# Altium PCB A313_4.PcbDoc (part 2 of 3)
Units mm, origin at the board's own origin, x right, y up, seen from the top; angles counter-clockwise.
Board outline 230 x 157 mm, 2 copper layers (Top Layer, Bottom Layer); 244 components, 187 nets, 1242 pads, 1093 vias.
Unrouted connection lines stored in the file: 1.
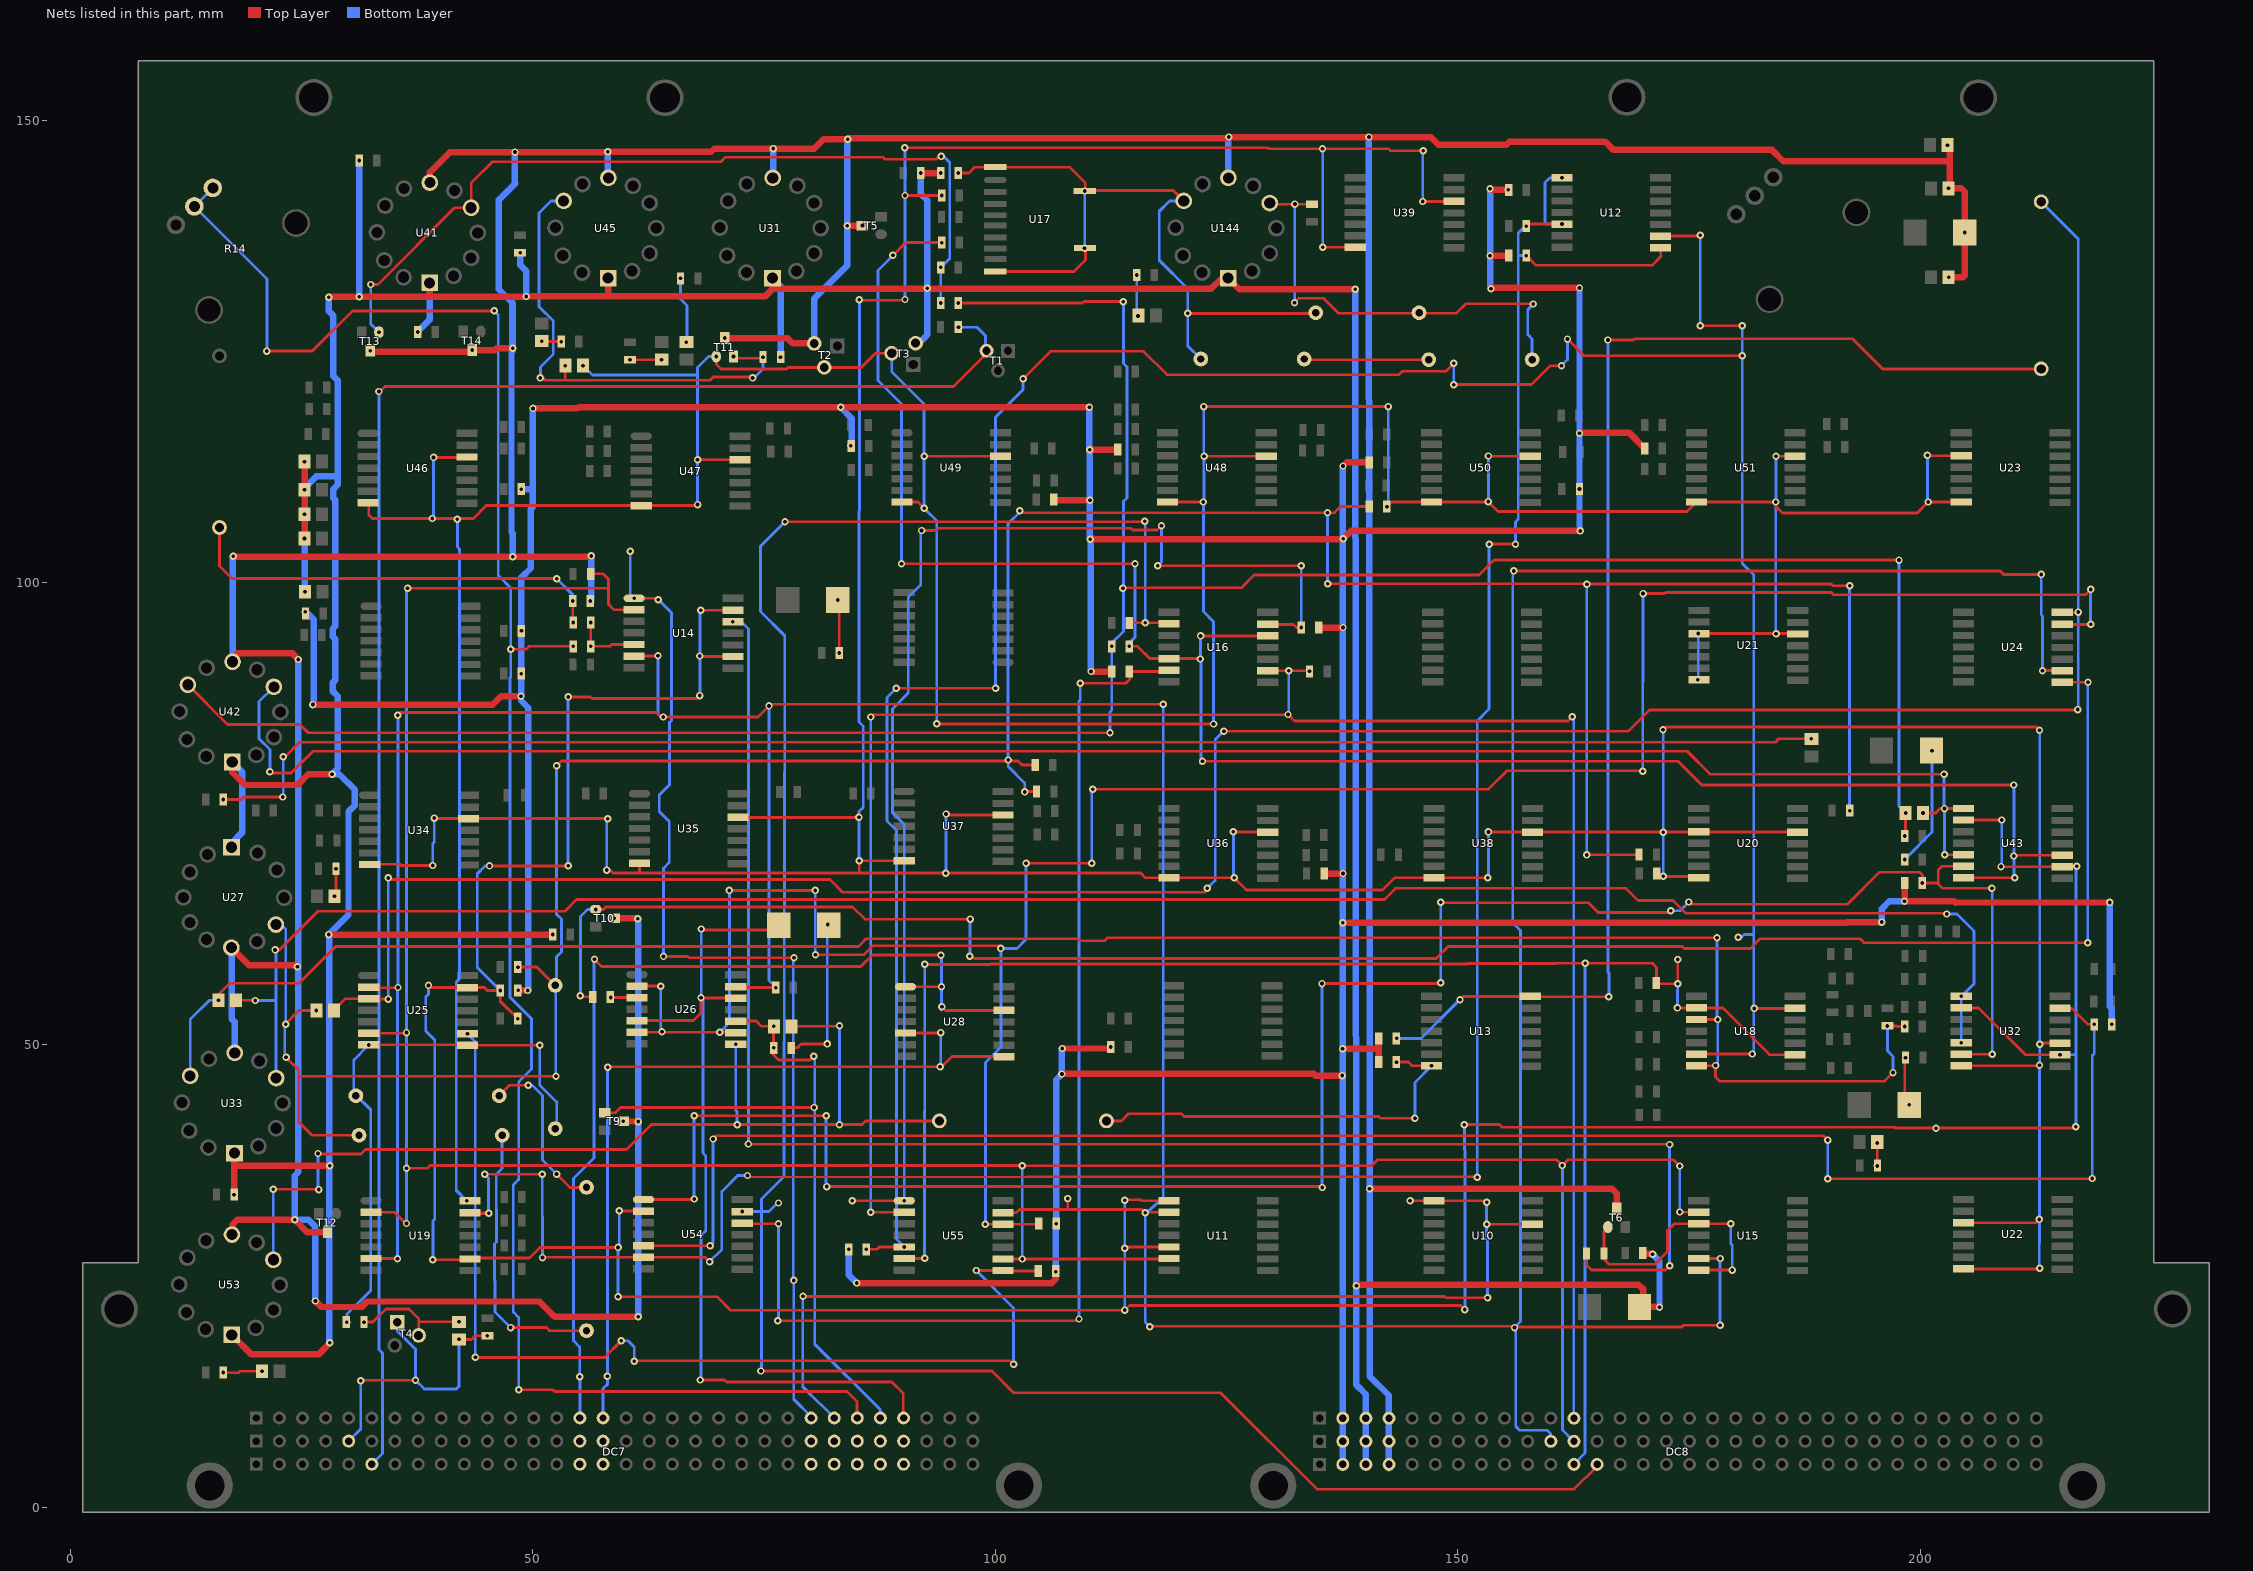
[diagram p2: the nets of this part, all layers, seen from the top]

## Via types
v1: diameter 0.8, hole 0.4, Top Layer to Bottom Layer, 1092 vias
v2: diameter 0.8, hole 0.4, Top Layer to Bottom Layer, tented top, 1 vias

## Nets (pads, with @x,y where several pads share a name; then routed paths per layer and width w, separated by ;. In a path a pad name is that pad's centre, name@x,y a point inside that pad or via, vN(x,y) a via of type N, cw(c..) or ccw(c..) an arc to the next point about the centre after c; other vN are vias at no path point) (continued)
+12,6V: C9.1 C14.1 C16.1 C18.1 DC8.A4 DC8.B4 DC8.C4 R12.2 T2.2 T5.2 T6.2 T9.2 T10.2 T11.2 T12.2 T13.2 T14.2 U27.7 U31.7 U33.7 U41.7 U42.7 U45.7 U53.7 U144.7 | length 720.9
  Top Layer w0.7: U27.7@17.375,60.519 U27.7@17.4,60.494 ; U27.7@17.4,61.019 U27.7@17.4,60.494 ; U53.7@17.508,29.455 17.508,30.558 18.025,31.075 v1(24.225,31.075) 25.563,29.737 T12.2@27.776,29.737 ; U42.7@17.508,91.431 17.508,91.783 18.05,92.325 24,92.325 24.625,91.7 v1(24.625,91.675) ; v1(17.575,102.85) 17.6,102.875 17.7,102.775 v1(47.8,102.775) 56.2,102.775 v1(56.3,102.875) ; v1(24.525,58.45) 24.35,58.625 19.269,58.625 U27.7@17.4,60.494 ; v1(26.475,22.3) 27.125,21.65 31.461,21.65 32.055,22.244 50.69,22.244 52.334,20.6 v1(61.375,20.6) ; T13.2@32.275,124.95 43.232,124.95 v1(43.417,125.135) 45.875,125.135 46.065,125.325 v1(47.8,125.325) ; U41.7@38.844,143.247 38.844,144.344 41.05,146.55 v1(48.05,146.55) 58.051,146.55 v1(58.076,146.575) 69.275,146.575 69.6,146.9 75.95,146.9 v1(75.975,146.925) 80.425,146.925 81.45,147.95 v1(84.025,147.95) 84.143,148.068 125.143,148.068 v1(125.25,148.175) v1(140.4,148.175) 147.1,148.175 147.925,147.35 155.269,147.35 155.569,147.65 165.975,147.65 166.85,146.775 184,146.775 185.21,145.565 203.218,145.565 ; v1(58.788,63.701) 61.069,63.701 v1@61.11,63.66 ; v1(59.776,41.724) v1(61.375,41.7) ; v1(70.749,126.438) 77.5,126.438 78.085,125.853 T2.2@80.416,125.853 ; T2.2@80.287,125.723 T2.2@80.407,125.603 ; v1(83.998,138.573) T5.2@85.299,138.573 ; v1(140.475,34.425) 166.7,34.425 167.19,33.935 T6.2@167.19,32.302 ; v1(203.091,133.011) 204.661,133.011 204.838,133.188 v1(204.838,137.853) 204.838,142.262 204.45,142.65 C16.1@203.25,142.65 ; C18.1@203.218,147.475 203.218,145.565 ; C16.1@203.599,142.663 203.218,143.044 203.218,145.565
  Bottom Layer w0.7: U27.7@17.4,60.519 17.4,52.825 17.75,52.475 U33.7@17.75,49.131 ; U42.7@17.508,91.431 v1@17.508,102.7 ; v1(24.625,91.675) 24.625,36.25 24.225,35.85 v1(24.225,31.075) 25.725,31.075 26.475,30.325 v1(26.475,22.3) ; v1@47.75,125.025 47.75,130.275 ; v1(47.8,102.775) 47.8,105.301 47.676,105.425 47.676,125.201 v1(47.8,125.325) 47.8,130.225 47.75,130.275 ; v1(48.05,146.55) 48.05,143.175 48.075,143.15 46.3,141.375 46.3,131.725 47.75,130.275 ; v1@56.3,97.993 v1(56.3,102.875) ; v1(58.076,146.575) 58.076,144.027 58.225,143.878 58.125,143.778 U45.7@58.148,143.755 ; v1(61.325,63.625) 61.375,63.575 v1(61.375,41.7) v1(61.375,20.6) ; U31.7@75.928,143.755 75.875,143.808 75.975,143.908 v1(75.975,146.925) ; T2.2@80.407,125.603 80.407,130.707 83.975,134.275 83.975,147.9 v1(84.025,147.95) ; U144.7@125.204,143.755 125.204,147.996 v1(125.25,148.175) ; v1(140.4,148.175) v1(140.475,34.425) 140.475,14.175 142.55,12.1 DC8.A4@142.55,4.225
  other v1: 56.201,97.993 32.401,125.062 85.637,138.599 203.075,142.625 202.975,147.3
-12,6V: C10.2 C11.2 C12.2 C13.2 C15.2 C17.2 DC8.A3 DC8.B3 DC8.C3 R25.1 R47.2 R48.2 R71.2 R72.2 R77.2 R78.2 R98.2 R99.2 T3.3 U27.1 U31.1 U33.1 U41.1 U42.1 U45.1 U53.1 U144.1 | length 552.6
  Top Layer w0.7: U53.1@17.483,18.609 19.567,16.525 26.8,16.525 28.025,17.75 v1(28.025,17.775) ; U42.1@17.483,80.585 17.483,79.492 18.875,78.1 24.525,78.1 25.7,79.275 v1(28.275,79.275) ; v1(17.676,33.793) 17.676,38.237 U33.1@17.725,38.285 17.725,37.175 17.975,36.925 v1(28.025,36.925) ; v1(25.296,113.072) C12.2@25.296,110.024 v1(25.3,110.02) v1(25.3,107.375) v1(25.3,104.75) ; v1@27.875,61.95 v1(27.9,61.925) v1(52.132,61.925) ; v1(27.925,130.85) 27.975,130.9 v1(31.225,130.9) 38.775,130.9 ; U41.1@38.7,132.283 U41.1@38.819,132.401 38.819,130.944 38.775,130.9 ; U45.1@58.123,132.909 58.123,130.998 58.1,130.975 ; U31.1@75.903,132.909 75.903,131.741 ; v1(91.927,144.28) R25.1@94.091,144.28 ; v1(138.925,131.7) 126.388,131.7 U144.1@125.179,132.909 124.471,132.909 123.325,131.763 75.925,131.763 75.903,131.741 ; v1(139.05,23.95) 139.159,24.059 169.591,24.059 170.046,23.604 C10.2@170.046,22.625 ; C10.2@169.645,21.661 171.789,21.661 v1(171.825,21.625) ; R47.2@170.026,27.418 171.007,27.418 v1(171.075,27.35) ; 38.775,130.9 49.2,130.9 49.275,130.975 58.1,130.975 ; 58.1,130.975 75.137,130.975 75.903,131.741
  Bottom Layer w0.7: U27.1@17.425,71.865 18.575,73.014 18.575,79.493 U42.1@17.483,80.585 ; v1(25.3,104.75) 25.325,104.725 v1@25.325,99.35 ; v1(25.3,110.02) 25.3,110.2 26.575,111.475 28.9,111.475 ; v1(27.9,61.925) 30.05,64.075 30.05,75.225 30.75,75.925 30.75,77.575 29.05,79.275 v1(28.275,79.275) 28.9,79.9 28.9,87.69 28.325,88.265 28.325,89.135 28.6,89.41 28.6,93.89 28.35,94.14 28.35,95.01 28.6,95.26 28.6,108.94 28.375,109.165 28.375,110.035 28.9,110.56 28.9,111.475 ; v1(27.925,130.85) 27.925,129.35 28.4,128.875 28.4,122.344 28.9,121.844 28.9,111.475 ; v1@27.984,61.925 27.984,17.709 28.025,17.75 v1(28.025,17.775) ; v1(31.199,145.632) 31.199,130.926 v1(31.225,130.9) ; v1(37.549,127.082) 37.549,127.149 38.819,128.419 U41.1@38.819,132.401 ; v1(48.618,135.674) 48.618,134.332 49.275,133.675 v1(49.275,130.925) ; U31.1@75.903,132.909 76.776,132.036 v1(76.776,124.368) ; T3.3@91.432,125.578 92.625,126.771 v1(92.625,131.825) 92.625,141.325 91.927,142.023 v1(91.927,144.28) ; v1(138.925,131.7) v1(139.05,23.95) 139.05,13.225 140.05,12.225 DC8.A3@140.05,4.625 ; v1(171.075,27.35) 171.825,26.6 v1(171.825,21.625)
  other v1: 25.35,99 94.101,144.275
-20V: DC8.A2 DC8.B2 DC8.C2 R11.2 R15.2 R44.1 R45.2 R101.2 R102.2 R103.2 R104.2 R109.2 R110.2 R111.2 R112.2 R117.2 R118.2 R119.2 R120.2 R125.2 R126.2 R127.2 R128.2 R133.2 R134.2 R135.2 R136.2 | length 621.2
  Top Layer w0.7: v1(26.2,86.8) 45.65,86.8 46.55,87.7 v1(48.7,87.7) ; R11.2@48.366,55.888 v1@49.437,55.888 ; v1(50,118.825) 54.801,118.825 54.925,118.949 106.85,118.949 106.851,118.95 v1(110.175,118.95) ; R110.2@84.136,27.889 v1(84.147,27.9) ; v1@85,24.228 106.078,24.228 106.532,24.682 R111.2@106.532,25.185 ; R128.2@106.326,108.893 v1(110.232,108.893) ; v1(107.2,46.85) 134.45,46.85 134.625,46.675 v1(137.525,46.675) ; v1(107.231,49.606) 112.323,49.606 v1(112.474,49.757) ; v1(110.225,114.35) 113.192,114.35 R125.2@113.224,114.382 ; v1(110.275,104.675) 137.575,104.675 v1(137.625,104.725) 138.475,105.575 v1(163.25,105.575) ; v1(110.352,90.373) R104.2@112.584,90.373 ; R109.2@134.98,95.131 v1(137.594,95.131) ; R126.2@135.551,68.543 135.914,68.543 135.569,68.525 v1(137.6,68.525) ; v1(137.55,49.575) 141.309,49.575 141.462,49.728 R44.1@141.462,50.808 ; v1(137.575,63.2) 192.05,63.2 192.125,63.275 v1(195.85,63.275) ; 137.979,112.979 R133.2@140.446,112.979 ; R45.2@141.462,48.258 141.462,49.575 ; v1@153.6,131.85 v1@163.15,131.85 ; v1@153.607,142.486 v1(155.485,142.486) ; v1@153.694,135.331 R15.2@155.51,135.331 ; v1@163.175,116.175 168.57,116.175 R135.2@170.242,114.503 ; R101.2@198.353,67.513 198.353,65.553 v1(198.325,65.525) 203.674,65.525 203.818,65.381 v1(220.525,65.4)
  Bottom Layer w0.7: v1@25.412,96.869 26.29,95.99 26.29,94.764 26.301,94.753 26.301,93.883 26.29,93.872 26.29,86.89 v1(26.2,86.8) ; 48.726,87.199 49.475,86.45 v1@49.475,55.9 ; v1@48.726,87.7 v1(48.726,90.143) 48.726,94.743 v1(48.751,94.768) 48.751,100.551 49.75,101.55 49.75,107.95 50,108.2 v1(50,118.825) ; v1(48.726,110.074) 48.727,110.075 49.75,110.075 ; v1(83.275,118.95) 84.451,117.774 84.451,114.937 84.361,114.937 84.424,114.874 84.354,114.804 v1(84.354,114.781) ; v1(84.147,27.9) 84.147,25.103 v1(85,24.25) ; v1(106.525,25.475) 106.525,30.775 v1@106.576,30.724 ; v1(106.576,30.668) v1@106.576,30.724 ; v1@107.2,49.475 v1(107.2,46.85) 106.575,46.225 106.576,46.224 v1@106.576,30.724 ; v1(110.175,118.95) 110.175,114.514 110.225,114.464 v1(110.225,114.35) 110.225,105.025 v1@110.307,104.943 ; v1@110.3,90.55 v1@110.3,104.9 ; DC8.A2@137.55,4.625 v1(137.55,49.575) v1@137.55,112.55 ; v1@153.525,131.775 v1@153.525,142.575 ; v1@163.174,105.651 v1(163.174,110.117) v1(163.175,131.85) ; v1(195.85,63.275) 195.85,64.7 196.675,65.525 v1(198.325,65.525) ; v1(220.525,65.4) 220.525,54.15 220.749,53.926 v1(220.749,52.218)
  other v1: 49.45,55.875 48.401,55.893 25.374,96.832 137.6,112.6 163.175,116.15 153.6,131.775 153.5,135.35 153.5,142.575
"A PR": DC7.A15 DC7.B15 DC7.C15 U28.1 U28.12 | length 106
  Top Layer w0.3: v1(56.65,59.25) 57.425,58.475 85.45,58.475 86.7,59.725 93.7,59.725 93.9,59.925 v1(94.125,59.7) ; U28.1@90.275,56.276 v1(94.174,56.276) v1@94.175,56.275 ; v1(94.225,54.125) 94.624,53.726 U28.12@100.95,53.726
  Bottom Layer w0.3: DC7.C15@55.075,9.65 55.075,14.075 v1(55.05,14.1) 55.05,17.332 54.375,18.007 54.375,35.525 56.6,37.75 v1@56.6,59.225 ; v1(94.125,59.7) 94.132,59.7 94.174,59.659 v1(94.174,56.276) v1@94.174,53.779
AA: R21.2 R26.1 T13.1 U41.5 | length 91.1
  Top Layer w0.3: v1(32.45,132.225) 33.225,132.225 41.529,140.529 U41.5@43.314,140.529 43.314,143.189 45.632,145.507 70.333,145.507 70.826,146 87.874,146 88.099,145.775 93.6,145.775 v1@93.825,146
  Bottom Layer w0.3: v1(32.45,132.225) 32.45,127.96 v1(33.341,127.069) ; v1@94.15,130.267 94.099,130.318 v1(94.099,134.082) 95.075,135.058 95.075,145.425 94.425,146.075 v1(94.15,146.075)
  other v1: 94.101,130.218
B: R22.2 R249.2 U16.5 U16.12 U43.7 U43.10 | length 214.5
  Top Layer w0.3: v1(88.925,135.375) 90.307,136.757 v1(94.199,136.757) ; v1@89.825,101.875 v1(89.85,102.025) v1(115.1,102.025) ; v1(114.484,93.099) 115.376,93.099 116.705,91.77 U16.5@118.793,91.77 121.895,91.77 v1@121.9,91.775 ; v1@122.175,80.45 v1(122.4,80.675) 173.825,80.675 176.4,78.1 v1(210.15,78.1) ; v1(122.195,94.22) U16.12@129.467,94.22 ; U43.7@204.708,68.061 v1(210.236,68.061) v1@210.15,68.148 ; v1(210.15,70.425) 210.236,70.511 U43.10@215.383,70.511
  Bottom Layer w0.3: v1(88.925,135.375) 87.3,133.75 87.3,121.85 89.85,119.3 v1@89.85,101.85 ; v1(114.484,93.099) 114.484,93.459 115.1,94.075 v1@115.1,101.775 ; v1@122.175,80.45 122.235,80.51 122.235,91.665 v1(122.175,91.725) ; v1@122.195,91.745 v1(122.195,94.22) ; v1@210.15,68.148 v1(210.15,70.425) v1(210.15,78.1)
"B PR": DC7.A16 DC7.B16 DC7.C16 U28.5 U28.8 | length 89.5
  Top Layer w0.3: v1@58.05,47.6 58.045,47.583 58,47.425 58.2,47.625 v1(94.025,47.625) 94.2,47.625 95.301,48.726 U28.8@100.95,48.726 ; U28.5@90.275,51.276 94.051,51.276 v1(94.1,51.325)
  Bottom Layer w0.3: DC7.C16@57.55,9.65 DC7.C16@57.575,9.675 ; DC7.C16@57.575,9.65 DC7.C16@57.575,9.675 ; v1(58.075,47.575) 58.05,47.55 v1(58.05,14.175) 58.05,13.3 57.575,12.825 DC7.C16@57.575,9.675 ; v1(94.025,47.625) 94.075,47.625 94.1,47.6 v1(94.1,51.325)
"COMP[NX UOP": DC7.A27 DC7.B27 DC7.C27 R14.1 R14.2 R16.1 | length 213.5
  Top Layer w0.3: v1(21.225,125.025) 26.125,125.025 30.475,129.375 v1(45.8,129.375) ; v1(47.6,92.775) 49.226,92.775 49.55,93.099 v1(54.34,93.099) ; v1(48.45,12.7) 52.134,12.7 52.334,12.5 83.975,12.5 85.05,11.425 DC7.C27@85.05,9.65
  Bottom Layer w0.3: R14.1@15.375,142.675 R14.2@13.375,140.675 21.225,132.825 v1(21.225,125.025) ; v1@45.65,129.5 46.25,128.9 46.25,100.75 47.6,99.4 v1(47.6,92.775) 47.6,89.791 47.525,89.716 47.525,55.15 49.85,52.825 49.85,47.4 48.45,46 48.45,35.45 47.875,34.875 47.875,21.1 48.45,20.525 v1(48.45,12.7)
"COMPAR CONTR": DC7.A6 R31.1 T1.3 | length 189.5
  Top Layer w0.3: v1(33.341,120.65) 33.427,120.65 33.976,121.199 95.464,121.199 T1.3@98.937,124.673 ; R31.1@95.991,127.871 96.025,127.837 v1(96.025,127.6)
  Bottom Layer w0.3: DC7.A6@32.55,4.65 33.725,5.825 33.725,16.65 33.341,17.034 v1(33.341,120.65) ; v1(96.025,127.6) 98.021,127.6 98.937,126.684 T1.3@98.937,124.673
"compar rpr": C23.2 DC7.B5 R46.1 T4.1 | length 33.8
  Top Layer w0.3: v1(31.375,13.675) 31.425,13.725 v1(37.3,13.725) ; v1(42,18.15) 43.35,18.15 43.751,18.551 v1(45.057,18.551)
  Bottom Layer w0.3: DC7.B5@30.05,7.15 31.375,8.475 v1(31.375,13.675) ; T4.1@35.325,20 35.325,19.05 37.3,17.075 v1@37.3,13.825 ; v1@37.1,13.8 37.275,13.8 v1@37.3,13.825 ; v1(42,18.15) 42,13.075 41.7,12.775 38.25,12.775 v1(37.3,13.725) v1@37.3,13.825
"CONTACT R": C21.1 DC7.A28 DC7.B28 DC7.C28 R283.2 T9.1 U26.10 | length 77
  Top Layer w0.3: T9.1@57.769,42.664 58.936,42.664 59.497,43.225 v1(80.4,43.225) v1@80.2,43.425 ; U26.10@71.936,52.573 74.15,52.573 74.722,52 C21.1@76.024,52 ; v1(76.05,52) C21.1@76.024,52 ; v1(80.375,48.775) 79.975,48.375 76.55,48.375 76.024,48.901 v1(76.024,49.682) C21.1@76.024,52
  Bottom Layer w0.3: 80.425,48.35 80.475,48.3 80.475,17.625 87.55,10.55 DC7.C28@87.55,9.65
"CONTACT X": C7.2 DC7.A29 DC7.B29 DC7.C29 U26.5 U26.12 | length 95.2
  Top Layer w0.3: U26.5@61.262,52.622 67.347,52.622 68.175,53.45 v1(68.175,55.1) 68.202,55.073 U26.12@71.936,55.073 ; v1(68.1,13.75) 70.725,13.75 70.95,13.525 88.8,13.525 90.05,12.275 DC7.C29@90.05,9.65 ; v1(68.2,62.525) 68.31,62.415 C7.2@76.502,62.415
  Bottom Layer w0.3: v1@68.175,13.95 68.175,29.35 68.675,29.85 68.675,38 68.375,38.3 68.375,54.9 v1(68.175,55.1) 68.2,55.125 v1(68.2,62.525)
D: DC8.B11 pad.2@107.825,33.375 R116.2 U11.2 U14.6 U15.6 U19.6 U24.9 U25.2 U26.13 U55.13 | length 518.6
  Top Layer w0.3: U25.2@32.242,56.245 32.313,56.175 v1(35.4,56.2) ; U19.6@32.496,26.893 35.332,26.893 v1(35.35,26.875) ; 35.65,85.95 63.375,85.95 v1@63.975,85.35 ; U14.6@60.944,92.044 v1@63.525,92.044 ; v1@64.275,85.45 74.325,85.45 v1(75.525,86.65) ; U26.13@71.936,56.323 72.049,56.21 R116.2@76.262,56.21 76.254,56.202 v1(76.254,56.178) ; v1@75.7,86.825 v1(118.15,86.825) ; U55.13@100.729,31.943 U55.13@100.829,31.943 ; U55.13@100.829,31.843 102.25,31.843 102.607,32.2 107.825,32.2 ; pad.2@107.825,33.375 107.825,32.2 ; v1@116.7,19.575 v1@156.15,19.575 ; U11.2@118.793,31.893 116.257,31.893 v1(116.207,31.843) 115.85,32.2 107.825,32.2 ; v1(156.075,101.25) 208.675,101.25 209.05,100.875 v1(213.1,100.875) ; v1@156.525,19.475 174.225,19.475 174.425,19.675 v1(178.375,19.675) ; U15.6@176.07,26.893 v1(178.382,26.893) ; v1@213.27,90.47 U24.9@215.383,90.47
  Bottom Layer w0.3: v1(35.35,26.875) v1@35.35,56.15 ; v1(35.4,56.2) v1@35.4,85.65 ; v1(63.525,92.075) 63.525,85.8 v1@63.875,85.45 ; v1(75.525,86.65) 75.525,56.949 76.275,56.199 v1(76.254,56.178) ; v1(116.207,31.843) 116.207,20.018 v1@116.574,19.651 ; v1@116.475,31.943 118.15,33.418 v1(118.15,86.825) ; v1@116.575,19.525 v1@116.574,19.651 ; v1(116.7,19.525) v1@116.574,19.651 ; v1@156.2,101.1 155.95,100.85 155.95,63.2 156.8,62.35 156.8,20.075 156.275,19.55 156.275,8.75 156.7,8.325 159.675,8.325 160.05,7.95 DC8.B11@160.05,7.125 ; v1@178.382,19.675 v1(178.382,26.893) ; v1(213.1,100.875) 213.1,96.525 213.25,96.375 v1(213.25,90.45)
  other v1: 156.15,19.425 64.075,85.45 35.375,85.65
D+C: R101.1 U32.6 U43.6 U54.1 | length 222
  Top Layer w0.3: U54.1@61.96,33.27 v1@67.425,33.27 ; v1(67.425,42.325) v1(81.7,42.325) ; v1(81.775,34.675) 135.25,34.675 v1(135.35,34.575) ; v1(135.325,56.625) v1@148.1,56.625 ; v1@148.3,65.375 164.125,65.375 165.2,64.3 v1@172.95,64.3 ; v1(175,65.45) 175.25,65.2 192.15,65.2 195.625,68.675 199.925,68.675 200.253,68.347 v1(200.253,67.513) 201.862,67.513 201.975,67.4 ; U32.6@204.454,48.991 v1(207.8,48.991) ; U43.6@204.708,69.311 202.386,69.311 201.975,68.9 201.975,67.4 ; v1(207.775,66.925) 202.45,66.925 201.975,67.4
  Bottom Layer w0.3: v1(67.425,33.325) v1(67.425,42.325) ; 81.7,35.125 v1(81.7,42.325) ; v1(135.325,56.625) 135.325,34.6 v1(135.35,34.575) ; v1@135.424,34.575 v1@135.425,34.375 ; v1(148.175,56.7) v1(148.175,65.425) ; v1(173.05,64.5) 174.05,64.5 v1(175,65.45) ; v1(207.8,48.991) v1@207.8,66.95
D+C_: R11.1 R105.2 U11.1 U11.5 U14.9 U14.13 U19.9 U25.13 U32.2 U32.9 U43.2 U43.9 U54.2 | length 407
  Top Layer w0.3: v1(38.7,56.425) 38.929,56.196 U25.13@42.917,56.196 44.75,56.196 45.057,55.888 v1(46.466,55.888) 46.466,54.719 v1(48.351,52.834) ; v1(39.175,26.75) 43.078,26.75 U19.9@43.171,26.843 U19.9@43.21,26.882 ; U19.9@43.278,26.95 49.625,26.95 50.742,28.092 v1(59.2,28.092) ; v1(45.3,69.35) v1@53.8,69.35 ; v1(53.8,87.625) 56.2,87.625 56.375,87.45 67.75,87.45 v1@68.05,87.75 ; v1(59.2,22.769) 69.906,22.769 71.375,21.3 v1@114,21.3 ; v1@59.325,32.02 U54.2@61.96,32.02 ; v1@68.131,96.994 U14.13@71.619,96.994 ; v1@68.194,91.994 U14.9@71.619,91.994 ; v1(114,21.319) 114.506,21.825 150.325,21.825 v1(150.778,21.372) ; v1@114.001,33.243 115.725,33.243 115.825,33.143 U11.1@118.793,33.143 ; v1@114.149,28.143 U11.5@118.793,28.143 ; v1(150.725,41.375) 154.5,41.375 154.775,41.1 197.175,41.1 197.281,40.994 v1@201.617,40.994 ; v1@201.725,40.886 v1@201.617,40.994 ; U32.2@204.454,53.991 206.334,53.991 211.384,48.941 v1(215.129,48.941) ; U43.2@204.708,74.311 v1(208.85,74.311) ; v1@208.761,69.261 U43.9@215.383,69.261 v1@216.892,69.261 ; v1@216.825,40.994 v1(201.725,40.994) v1@201.617,40.994
  Bottom Layer w0.3: v1(38.7,56.425) 38.7,55.475 38.4,55.175 38.4,51.5 39.375,50.525 39.375,31.15 39.175,30.95 v1(39.175,26.75) ; v1(45.3,69.35) 44.825,69.35 43.975,68.5 43.975,58.379 v1(46.466,55.888) ; v1(53.8,69.369) v1(53.8,87.625) ; v1(59.2,22.769) v1(59.2,28.092) ; v1@59.325,28.217 v1(59.325,32.05) ; v1(68.05,87.769) v1(68.05,92.05) v1@68.05,96.933 ; v1(114,21.319) v1(114,27.994) v1@114,33.175 ; v1(150.725,41.375) 150.725,38.678 150.778,38.625 v1(150.778,21.372) ; v1@208.85,69.369 v1(208.85,74.311) ; v1(215.129,48.941) 216.84,48.941 216.859,48.96 ; v1@216.859,41.184 216.859,48.96 ; v1@216.859,69.084 216.859,48.96
  other v1: 114,33.194 216.825,41.15 208.761,69.28 216.95,69.319 68.131,97.013
D_: R112.1 U24.13 U26.2 U26.6 U26.9 U55.12 | length 268.5
  Top Layer w0.3: U26.6@61.262,51.373 U26.9@71.886,51.373 ; U26.2@61.384,56.25 61.262,56.372 63.803,56.372 v1(63.825,56.35) ; v1(71.225,66.7) v1(80.525,66.7) ; v1(80.55,59.75) 85.8,59.75 86.775,60.725 100.3,60.725 v1(100.6,60.425) ; v1(98.925,30.593) U55.12@100.829,30.593 R112.1@104.476,30.593 ; v1(103.325,69.65) v1(110.425,69.65) ; v1(110.55,77.65) 153.325,77.65 155.31,79.635 v1@169.99,79.635 ; v1(170.05,98.8) v1@170.25,98.8 ; v1@170.125,98.675 v1@170.25,98.8 ; U24.13@215.383,95.47 v1(218.45,95.47) ; v1(218.45,99.25) 217.875,98.675 190.65,98.675 190.4,98.925 172.5,98.925 172.375,98.8 v1@170.25,98.8
  Top Layer w0.7: U26.9@71.886,51.373 U26.9@71.936,51.323
  Bottom Layer w0.3: v1@63.825,51.55 v1(63.825,56.35) ; v1(70.2,51.35) 71.25,52.4 v1@71.25,66.7 ; v1@80.525,60.025 v1(80.525,66.7) ; v1(98.925,30.593) 98.925,48.075 100.6,49.75 v1(100.6,60.425) 102.325,60.425 103.325,61.425 v1(103.325,69.65) ; v1(110.425,69.65) v1@110.425,77.775 ; v1(170.025,79.575) v1(170.05,98.8) ; v1(218.45,95.47) v1(218.45,99.25)
  other v1: 63.95,51.425
F: DC8.A12 pad.2@173.8,59.225 R114.2 U18.2 U18.9 U55.6 | length 192.4
  Top Layer w0.3: U55.6@90.154,26.893 92.343,26.893 v1(92.375,26.925) ; v1(92.375,58.7) 92.45,58.625 92.51,58.685 99.385,58.685 99.45,58.75 151.102,58.75 151.152,58.8 160.577,58.8 160.602,58.825 v1(163.8,58.825) 171.05,58.825 171.507,58.368 171.507,56.943 R114.2@171.629,56.821 ; R114.2@171.476,56.668 171.544,56.6 v1(173.8,56.6) pad.2@173.8,59.225 ; v1(173.764,53.991) U18.2@175.816,53.991 178.684,53.991 183.734,48.941 U18.9@186.49,48.941
  Bottom Layer w0.3: v1(92.375,26.925) 92.343,26.957 92.343,42.837 92.375,42.869 v1(92.375,58.7) ; DC8.A12@162.55,4.625 163.775,5.85 163.775,58.9 v1@163.725,58.95 ; v1(173.764,53.991) 173.764,55.859 173.8,55.823 v1(173.8,56.6)
F_: R110.1 U12.9 U18.6 U18.13 U55.5 | length 308
  Top Layer w0.3: v1(86.036,27.889) 87.196,27.889 87.45,28.143 v1(90.154,28.143) ; v1(89.3,88.575) v1(100.025,88.575) ; v1(103,122.025) 105.975,125 116.025,125 118.55,122.475 143.675,122.475 144.05,122.85 148.725,122.85 v1(149.575,123.7) ; v1(149.575,121.4) 157.975,121.4 160.025,123.45 v1(161.225,123.45) ; v1(161.875,126.325) 163.675,124.525 v1(180.775,124.525) ; U12.9@171.949,137.46 v1@176.035,137.46 ; U18.6@175.816,48.991 175.816,49.009 v1(181.841,49.009) ; v1(176.225,127.775) v1(180.775,127.775) ; v1(182.059,53.941) U18.13@186.49,53.941
  Bottom Layer w0.3: v1(89.3,88.575) 88.275,87.55 88.275,74.2 89.3,73.175 89.3,28.997 v1(90.154,28.143) ; v1(100.025,88.575) 100.025,117.875 103,120.85 v1@103,121.975 ; v1(149.575,121.4) v1(149.575,123.7) ; v1@161.4,123.625 161.875,124.1 v1(161.875,126.325) ; v1(176.225,127.775) v1(176.225,137.55) ; v1(180.35,61.625) 180.675,61.625 180.975,61.925 182.025,61.925 ; v1(180.775,127.775) v1(180.775,124.525) 180.775,102.05 182.025,100.8 182.025,61.925 ; v1@182.025,48.9 182.025,61.925
G: R24.2 R290.2 U20.3 U20.7 U20.12 U22.3 U22.7 U32.7 U32.10 U34.7 U34.12 U35.7 U35.12 U36.7 U36.12 U37.7 U37.12 U38.7 U38.12 U39.7 U39.12 | length 526.7
  Top Layer w0.3: U34.7@32.496,69.522 35.625,69.522 35.747,69.4 v1(39.169,69.4) ; v1@39.1,74.5 39.128,74.472 58.076,74.472 58.078,74.472 v1@58.1,74.45 ; v1@58.2,69.025 58.65,68.575 61.475,68.575 ; U35.7@61.392,69.525 U35.7@61.516,69.649 61.516,68.616 61.475,68.575 ; U35.12@72.19,74.599 v1(85.249,74.599) ; v1@85.301,130.518 90.276,130.518 v1@90.201,130.418 ; U37.7@90.154,69.903 v1(85.275,69.903) 85.275,68.575 ; v1(90.209,147.018) 90.216,147.025 94.544,147.025 94.55,147.018 129.467,147.018 129.567,146.918 v1(135.376,146.918) 142.522,146.918 142.74,146.7 v1(146.275,146.7) ; v1@90.257,141.857 v1(94.199,141.857) ; v1@94.7,74.975 94.822,74.853 U37.12@100.829,74.853 ; v1@125.75,73.05 125.789,73.011 U36.12@129.467,73.011 ; v1(125.84,68.054) 127.144,66.75 141.875,66.75 143.186,68.061 U38.7@147.431,68.061 v1(153.239,68.061) ; v1@125.9,68.025 125.864,68.061 U36.7@118.793,68.061 116.239,68.061 115.725,68.575 85.275,68.575 ; v1@135.4,136.3 135.44,136.26 U39.7@138.922,136.26 ; v1@146.235,141.21 U39.12@149.597,141.21 ; v1@153.55,73.1 153.639,73.011 U38.12@158.106,73.011 176.07,73.011 U20.12@186.744,73.011 ; R290.2@171.507,68.207 172.226,68.207 175.924,68.207 U20.7@176.07,68.061 ; v1(172.202,84.092) 172.485,84.375 212.569,84.375 v1(212.926,84.018) ; U32.7@204.454,47.741 212.874,47.741 v1(212.926,47.793) ; U22.7@204.708,25.77 v1@212.902,25.77 ; U22.3@204.708,30.77 212.554,30.77 v1(212.902,31.118) ; v1@213.066,50.191 U32.10@215.129,50.191 ; 61.475,68.575 85.275,68.575
  Bottom Layer w0.3: v1(39.169,69.4) 39.169,71.8 39.325,71.956 v1(39.325,74.525) ; v1@57.975,68.65 v1(57.975,68.9) 57.975,74.342 v1(58.076,74.443) ; v1@85.075,69.893 85.249,70.067 v1(85.249,74.599) 85.249,75.224 85.725,75.7 85.725,84.433 85.258,84.9 v1(85.3,130.575) ; v1@90.233,130.45 v1(90.233,130.6) v1(90.233,141.85) v1@90.233,147.025 ; v1(94.626,68.568) 94.676,68.618 v1(94.676,74.968) ; v1(125.726,73.043) 125.75,73.019 125.75,68.192 125.726,68.168 v1(125.84,68.054) ; v1@135.4,146.925 135.416,146.909 v1(135.416,136.253) ; v1(146.211,141.203) 146.211,146.586 v1@146.3,146.675 ; v1(153.239,68.061) 153.325,68.148 v1(153.325,73.025) ; v1@172.15,84.175 172.226,84.099 v1(172.226,72.993) ; v1(172.226,68.218) 172.226,72.976 v1@172.25,73 ; v1@212.85,47.7 v1@212.926,47.776 ; v1@212.875,84.1 212.95,84.025 v1(212.95,50.075) 212.95,47.8 v1@212.926,47.776 ; v1@212.902,25.825 212.908,31.118 v1@212.926,47.776 ; v1(212.926,47.793) v1@212.926,47.776
  other v1: 212.95,25.825
INT.A: DC7.A25 DC7.B25 DC7.C25 pad.2@60.525,103.374 U14.1 | length 112.6
  Top Layer w0.3: U14.1@61.544,98.294 63.406,98.294 v1(63.55,98.15) ; v1(64.111,59.56) 66.765,59.56 66.9,59.425 v1(78.224,59.425)
  Bottom Layer w0.3: pad.2@60.525,103.35 60.525,98.713 v1(60.944,98.294) ; v1(63.55,98.15) 64.975,96.725 64.975,85.077 64.775,84.877 64.775,78.125 63.65,77 63.65,75.25 64.725,74.175 64.725,69.7 64.111,69.086 v1(64.111,59.56) ; v1(78.224,59.425) 78.199,59.425 78.15,59.474 78.15,59.425 78.15,24.575 v1(78.2,24.525) 78.2,11.67 80.05,9.82 DC7.C25@80.05,9.65
INT.B: DC7.A26 DC7.B26 DC7.C26 U10.1 U10.12 | length 112.4
  Top Layer w0.3: v1(79.2,22.8) 148.575,22.8 148.732,22.643 v1(153.232,22.643) ; v1(144.85,33.125) 144.868,33.143 U10.1@147.431,33.143 v1@153.218,33.143 ; v1(153.132,30.593) U10.12@158.106,30.593
  Bottom Layer w0.3: v1(79.2,22.8) 79.175,22.775 79.175,13.025 81.1,11.1 81.161,11.1 82.55,9.711 DC7.C26@82.55,9.65 ; v1(153.132,32.986) v1(153.132,30.593) 153.132,29.275 153.232,29.175 v1(153.232,22.643)
K: DC8.B12 R115.2 U11.6 U14.2 U15.2 U19.2 U25.6 U55.9 | length 311.3
  Top Layer w0.3: U25.6@32.242,51.246 36.246,51.246 v1(36.325,51.325) ; U19.2@32.496,31.893 35.043,31.893 36.293,30.643 v1(36.325,30.675) ; v1(36.325,36.65) 38.575,36.65 38.875,36.95 v1@102.9,36.95 ; v1(36.438,99.387) 58.175,99.387 ; R115.2@56.226,100.943 57.582,100.943 58.175,100.35 58.175,99.387 ; U14.2@60.944,97.044 58.781,97.044 58.175,97.65 58.175,99.387 ; U55.9@100.829,26.843 v1(102.9,26.843) 118.743,26.843 U11.6@118.793,26.893 ; v1(102.9,36.925) 140.7,36.925 141.35,37.575 160.691,37.575 v1@161.316,36.95 ; v1@161.318,36.907 v1@161.316,36.95 ; v1(174,36.9) 173.325,37.575 161.95,37.575 v1(161.325,36.95) v1@161.316,36.95 ; v1(174.018,31.918) U15.2@176.07,31.893
  Bottom Layer w0.3: v1(36.325,30.675) v1(36.325,36.65) v1(36.325,51.325) v1@36.325,99.5 ; v1(102.9,26.843) v1(102.9,36.925) v1@102.95,36.975 ; v1(161.325,36.95) 161.325,8.35 DC8.B12@162.55,7.125 ; v1(174.018,31.918) v1@174.018,36.882
K_: R111.1 U25.9 U55.8 | length 114.7
  Top Layer w0.3: v1(43.775,16.2) 57.75,16.2 v1(59.55,18) ; v1@61.075,15.825 101.6,15.825 v1(101.975,15.45) ; v1(97.932,25.593) U55.8@100.829,25.593 100.887,25.535 R111.1@104.632,25.535
  Bottom Layer w0.3: v1(42.917,51.196) 43.75,50.363 43.75,16.325 v1@43.825,16.25 ; v1(59.55,18) 60.275,18 60.95,17.325 v1(60.95,15.775) ; v1(97.932,25.593) 101.975,21.55 v1(101.975,15.45)
KN1: DC8.A13 R108.2 U16.2 U54.13 | length 250.2
  Top Layer w0.3: v1(74.65,14.725) 99.625,14.725 101.975,12.375 124.35,12.375 134.775,1.95 162.6,1.95 165.05,4.4 DC8.A13@165.05,4.625 ; v1(77.25,106.575) v1@116.175,106.575 ; R108.2@114.484,95.639 v1(116.225,95.639) 118.674,95.639 U16.2@118.793,95.52
  Bottom Layer w0.3: v1(72.635,31.97) 74.722,31.97 ; v1@74.722,14.725 74.722,31.97 ; v1(76.55,32.9) 76.45,32.9 75.52,31.97 74.722,31.97 ; v1(77.25,106.575) 74.6,103.925 74.6,96.875 77.233,94.242 77.233,94.175 77.152,35.752 74.722,33.323 74.722,31.97 ; v1(116.225,95.639) v1@116.225,106.275
  other v1: 116.175,106.625
KN1_: R104.1 U16.6 U54.12 | length 126.3
  Top Layer w0.3: U54.12@72.635,30.72 72.69,30.665 76.315,30.665 v1@76.475,30.825 ; v1(76.475,20.175) 109.025,20.175 109.05,20.2 v1(109.05,20.35) ; v1(109.175,89.1) 114.1,89.1 114.573,89.573 114.573,90.373 U16.6@118.645,90.373
  Bottom Layer w0.3: v1(76.475,20.175) 76.55,20.25 v1(76.55,30.643) ; v1(109.05,20.35) 109.05,87.175 109.175,87.3 v1@109.175,89
KN2: DC8.C12 R113.2 U16.9 U55.2 | length 219.2
  Top Layer w0.3: v1@86.275,31.925 86.307,31.893 v1(86.525,31.893) U55.2@90.154,31.893 ; v1@86.5,85.575 86.85,85.725 131.65,85.7 v1@131.675,85.7 ; U16.9@129.467,90.47 v1(131.725,90.445) 133.903,90.445 R113.2@133.975,90.373 ; v1(131.65,85.725) v1@131.675,85.7 ; v1@131.85,85.7 v1@131.675,85.7 ; v1@162.3,85.35 162.4,85.45 v1(162.4,85.475) 161.95,85.025 132.35,85.025 v1@131.675,85.7
  Bottom Layer w0.3: v1@86.475,85.5 v1(86.525,85.45) v1(86.525,31.893) ; v1@131.725,85.8 v1(131.725,90.445) ; DC8.C12@162.55,9.625 v1@162.55,85.325
  other v1: 133.975,90.4
KN2_: R109.1 U16.13 U55.1 | length 136.5
  Top Layer w0.3: v1@84.525,33.143 v1(84.532,33.143) v1(90.154,33.143) ; v1(92.025,105.625) 93.675,105.625 93.925,105.875 114.625,105.875 114.825,105.675 117.5,105.675 v1(117.975,106.15) ; v1(117.57,101.805) v1(133.08,101.805) ; U16.13@129.467,95.47 132.224,95.47 132.564,95.131 v1(133.08,95.131)
  Bottom Layer w0.3: v1(90.154,33.143) 90.154,73.821 88.875,75.1 88.875,86.325 90.575,88.025 90.575,98.375 91.925,99.725 v1@91.925,105.475 ; v1(117.57,101.805) 117.975,102.21 v1(117.975,106.15) ; v1(133.08,95.131) v1(133.08,101.805)
KOPP: R15.1 R106.2 U12.1 U12.5 U12.8 U19.13 U54.6 | length 267.1
  Top Layer w0.3: 44.793,31.843 U19.13@43.171,31.843 43.239,31.775 v1(45.201,31.775) ; v1(44.793,36.007) v1@51,36.007 ; v1@51.03,27.02 U54.6@61.96,27.02 68.63,27.02 v1(69.098,26.552) ; v1(73.2,35.869) 73.394,35.675 103.489,35.725 v1@151.906,35.725 ; v1(153.4,104.15) v1(156.25,104.15) ; R15.1@157.424,135.357 158.481,134.3 171.025,134.3 171.949,135.224 U12.8@171.949,136.21 ; R106.2@157.605,138.76 v1(161.274,138.76)
  Bottom Layer w0.3: v1(44.793,36.007) 45.201,35.599 v1(45.201,31.775) ; v1(51,36) v1(51.03,26.996) ; v1(69.098,26.552) 70.425,27.879 70.425,34.15 72.15,35.875 v1@73.2,35.875 ; v1@152.125,35.875 152.125,85.05 153.4,86.325 v1@153.4,103.75 ; v1(156.25,104.15) 156.25,106.55 156.55,106.85 156.55,135.364 ; v1@157.225,138.475 156.55,137.8 156.55,135.364 ; v1@157.396,135.364 156.55,135.364 ; v1(161.274,138.76) 159.609,138.76 159.45,138.919 159.45,143.25 159.96,143.76 v1(161.274,143.76)
  other v1: 152.125,35.675 157.41,135.35 157.4,138.519
KOPP_: R102.1 U32.13 U54.5 | length 193.7
  Top Layer w0.3: U54.5@61.96,28.27 v1(69.15,28.27) ; v1(69.475,39.819) 69.831,40.175 189.55,40.175 v1(190.025,39.7) ; v1(190.025,35.519) v1@218.625,35.519 ; U32.13@215.129,53.941 216.425,53.941 218.148,52.218 v1(218.849,52.218)
  Bottom Layer w0.3: v1(69.15,28.27) 69.475,28.595 v1@69.475,39.8 ; v1(190.025,35.519) v1(190.025,39.7) ; v1(218.625,35.55) 218.625,48.826 218.849,49.05 v1(218.849,52.218) ; v1@218.676,35.552 v1@218.678,35.55
NetC5_2: C5.2 R27.1 | length 4.4
  Bottom Layer w0.3: v1(115.301,133.256) 115.301,128.949 v1@115.375,128.875
  other v1: 115.425,128.825
NetC6_1: C6.1 R40.1 | length 5.8
  Top Layer w0.3: v1(82.955,98.114) 83.129,97.94 v1(83.129,92.382)
NetC7_1: C7.1 R283.1 | length 17.1
  Top Layer w0.3: R283.1@77.924,49.682 78.582,49.682 79,50.1 v1(81.825,50.1)
  Bottom Layer w0.3: v1@81.85,50.075 v1(81.825,50.1) 81.825,62.975 v1(81.875,63.025)
NetC8_1: C8.1 R42.2 | length 2.9
  Top Layer w0.3: C8.1@28.701,66.165 v1(28.701,69.043)
  other v1: 28.525,66.075
NetC20_1: C20.1 D8.2 U24.14 U25.3 | length 278.8
  Top Layer w0.3: C20.1@28.475,53.725 29.746,54.996 U25.3@32.242,54.996 32.288,54.95 v1(34.35,54.95) ; v1(34.35,68.05) 34.525,67.875 82.1,67.875 83.475,66.5 86.942,66.5 86.952,66.51 88.348,66.51 88.358,66.5 122.625,66.5 v1@123.1,66.975 ; v1(124.719,83.906) 168.406,83.906 170.725,86.225 v1@217.225,86.225 ; U24.14@215.383,96.77 217.07,96.77 v1(217.1,96.8)
  Bottom Layer w0.3: v1@34.2,68.2 v1(34.35,68.05) v1(34.35,54.95) ; v1(122.919,66.931) 123.775,67.787 123.775,83 v1@124.65,83.875 ; D8.2@213.1,141.177 217.1,137.177 v1(217.1,96.8) 217.1,86.287 v1(217.069,86.256)
NetC20_2: C20.2 D5.2 D6.1 R39.2 R67.2 R68.2 R69.2 R70.2 R299.2 U27.9 | length 348.4
  Top Layer w0.3: v1@23.166,52.216 24.675,53.725 v1(26.575,53.725) ; v1(23.3,48.65) 24.675,47.275 24.675,46.425 ; D5.2@31.181,40.225 26.1,40.225 24.675,41.65 24.675,46.425 ; R39.2@48.366,58.428 50.41,58.428 D6.1@52.408,56.43 ; D6.1@52.422,56.444 D6.1@52.463,56.402 ; v1(52.491,46.616) 24.866,46.616 24.675,46.425 ; v1(52.55,80.175) 53.086,80.711 102.425,80.711 102.879,80.257 R68.2@104.224,80.257 ; v1@102.475,107.55 v1(135.925,107.55) 136.675,107.55 137.332,108.207 R299.2@140.449,108.207 ; v1@103.232,77.407 R67.2@104.449,77.407 ; R68.2@104.299,80.257 R68.2@104.224,80.257 ; R68.2@104.399,80.082 R68.2@104.224,80.257 ; v1@135.775,99.675 v1(135.96,99.86) 163.94,99.86 v1(163.975,99.825) 190.4,99.825 190.575,99.65 v1(192.4,99.65) ; v1@163.961,70.561 R69.2@169.607,70.561
  Bottom Layer w0.3: U27.9@22.201,63.008 22.726,63.008 23.275,62.459 v1(23.275,52.225) 23.275,52 v1@23.2,51.925 ; v1@23.166,52.216 23.166,48.784 v1(23.3,48.65) ; v1@52.45,46.65 52.463,46.663 52.463,56.402 52.55,56.489 52.55,59.525 53.075,60.05 53.075,63.6 52.55,64.125 v1(52.55,80.175) ; v1@101.375,80.711 101.375,106.35 102.65,107.625 v1(102.65,107.75) ; v1(101.4,80.8) 101.4,80.1 103.175,78.325 v1(103.175,77.35) ; v1(135.925,107.55) 135.925,99.895 v1(135.96,99.86) ; v1(163.966,70.541) 163.965,70.543 163.965,99.815 v1(163.975,99.825) ; v1(192.384,75.319) 192.384,99.566 192.35,99.6 v1(192.4,99.65)
  other v1: 48.375,58.4
NetC21_2: C21.2 D9.2 U26.8 U53.5 | length 109.6
  Top Layer w0.3: v1(21.92,34.37) v1@26.75,34.375 ; v1@26.75,38.21 31.41,38.21 31.875,38.675 60.1,38.675 62.8,41.375 v1(72.075,41.375) v1(83.15,41.375) 85.575,41.375 85.975,41.775 D9.2@93.95,41.775 ; C21.2@77.95,52 v1@83.1,52
  Bottom Layer w0.3: U53.5@21.92,26.763 v1(21.92,34.37) ; v1(26.75,38.25) 26.75,34.425 v1(26.825,34.35) ; v1(71.925,50.051) 71.925,42.925 72.075,42.775 v1(72.075,41.375) ; v1(83.15,41.375) v1(83.15,52.05)
NetC23_1: C23.1 R43.2 T4.3 | length 13.2
  Top Layer w0.3: R43.2@31.726,20.018 32.668,20.018 34.094,21.444 36.606,21.444 37.639,20.411 37.639,20 ; T4.3@37.639,18.573 37.639,20 ; v1(42,20.05) 37.689,20.05 37.639,20
  other v1: 31.725,20
NetC26_1: C26.1 R49.1 | length 7.2
  Bottom Layer w0.3: v1(65.951,132.893) 65.951,130.656 66.651,129.956 66.651,126.068 v1(66.576,125.993)
NetC27_1: C27.1 pad.2@198.83,43.514 R52.2 | length 5.1
  Top Layer w0.3: C27.1@198.353,44.008 R52.2@198.353,49.098
  other v1: 198.424,48.6
NetC28_1: C28.1 R51.1 | length 2.8
  Top Layer w0.3: v1(195.375,36.906) C28.1@195.375,39.5 C28.1@195.499,39.376
  other v1: 195.361,39.395
NetC29_1: C29.1 R50.2 R300.2 U18.3 U18.7 U33.9 | length 222.4
  Top Layer w0.3: C29.1@15.975,54.825 15.975,55.45 17.175,56.65 24.675,56.65 28.675,60.65 85.2,60.65 86.025,61.475 108.9,61.475 109.125,61.25 111.8,61.25 112.141,61.591 v1(178.041,61.591) ; U18.7@175.816,47.741 v1@177.891,47.741 ; U18.3@175.816,52.741 v1(178.116,52.741) ; v1(177.891,47.766) v1@177.891,47.741 ; v1@177.987,61.537 178.15,61.375 v1@178.25,61.475 ; v1(196.468,52.049) 197.458,52.049 197.525,51.982 v1(198.349,51.982) ; v1(197.075,47) 196.15,46.075 178.325,46.075 177.891,46.509 v1@177.891,47.741
  Bottom Layer w0.3: U33.9@12.924,46.642 12.924,52.749 15,54.825 v1(16,54.825) ; v1(177.891,47.766) 178.116,47.991 v1(178.116,52.741) 178.041,52.816 v1(178.041,61.591) ; v1(196.468,52.049) 196.468,49.357 197.075,48.75 v1(197.075,47)
NetC29_2: C29.2 U32.1 U32.5 U33.5 | length 218.8
  Top Layer w0.3: C29.2@17.875,54.825 19.925,54.825 v1(19.95,54.8) ; v1(22.112,60.266) 22.566,60.266 26.75,64.45 53.45,64.45 54.725,65.725 142.075,65.725 143.275,66.925 168.19,66.925 169.51,65.605 173.295,65.605 174.675,64.225 202.483,64.225
  Bottom Layer w0.3: v1(19.95,54.8) 22.145,54.8 22.22,54.875 ; U33.5@22.22,46.413 22.22,54.875 ; v1@22.22,60.195 22.22,54.875 ; v1(202.875,64.15) 204,64.15 205.825,62.325 205.825,56.612 v1(204.454,55.241) v1(204.454,50.241)
NetC30_1: C30.1 R73.2 | length 3.4
  Top Layer w0.3: v1(60.493,124.099) v1(63.899,124.099)
NetC31_1: C31.1 R75.2 | length 13
  Bottom Layer w0.3: v1(198.353,70.053) 201.3,73 v1(201.3,81.8)
NetC32_1: C32.1 R76.1 | length 176.9
  Top Layer w0.3: v1(16.499,76.532) 18.457,76.532 18.725,76.8 v1(22.932,76.8) ; v1@23.225,81.2 24.75,82.725 184.35,82.725 184.725,83.1 v1(188.25,83.1)
  Bottom Layer w0.3: v1@23,76.625 v1(23,81.15)
NetC33_1: C33.1 R26.2 R74.2 R249.1 U42.9 | length 282.4
  Top Layer w0.3: U42.9@12.682,88.942 16.978,84.646 24.804,84.646 25.7,83.75 v1(112.4,83.75) ; v1(96.001,130.218) 109.425,130.218 109.582,130.375 v1(113.85,130.375) ; v1@113.8,99.225 114,99.425 126.6,99.425 127.985,100.81 152.31,100.81 153.925,102.425 v1(197.725,102.425) ; R74.2@198.425,72.743 C33.1@198.425,75.075 v1(198.45,75.075)
  Bottom Layer w0.3: v1(112.4,83.75) 112.4,85.991 112.584,86.175 v1(112.584,93.099) 112.584,93.434 113.85,94.7 113.85,108.778 114.225,109.153 114.225,123.325 113.85,123.7 113.85,130.175 v1@113.8,130.225 ; v1(197.725,102.425) 197.725,75.8 v1(198.45,75.075)
  other v1: 198.353,72.593 113.8,99.375
NetC33_2: C33.2 U42.5 U43.1 U43.5 | length 208.5
  Top Layer w0.3: v1@21.55,79.4 23.85,79.4 26.2,81.75 174.825,81.75 177.3,79.275 202.325,79.275 202.6,79 v1@202.625,79 ; C33.2@200.411,75.161 v1(200.325,75.075) 201.7,75.075 202.175,75.55 v1(202.65,75.55) U43.1@204.375,75.55 ; v1@202.625,70.525 v1(202.661,70.561) U43.5@204.708,70.561
  Bottom Layer w0.3: v1(21.55,79.525) 21.55,81.925 20.375,83.1 20.375,87.11 U42.5@21.978,88.713 ; v1@202.6,79 202.6,75.6 v1(202.65,75.55) 202.65,70.572 v1(202.661,70.561)
  other v1: 202.6,79.275
NetC34_1: C34.1 R79.2 | length 2.3
  Top Layer w0.3: C34.1@50.775,126.075 R79.2@53.026,126.075
  other v1: 53.05,126.051 50.95,126.1
NetC35_1: C35.1 R100.1 | length 4.1
  Top Layer w0.3: R100.1@16.678,14.55 18.161,14.55 18.311,14.7 v1(20.7,14.7)
  other v1: 16.499,14.557
NetC36_1: C36.1 R78.1 T11.3 U45.9 | length 53.4
  Top Layer w0.3: v1(50.8,122.125) 50.8,122.406 51.331,121.875 53.5,121.875 69.15,121.875 69.5,122.225 v1@73.675,122.225 ; 53.5,121.875 v1(53.5,123.45) ; T11.3@71.714,124.256 74.539,124.256 R78.1@74.851,124.568
  Bottom Layer w0.3: v1(50.8,122.125) 50.8,123.301 52.2,124.701 52.2,128.275 50.65,129.825 50.65,139.95 51.966,141.266 U45.9@53.322,141.266 ; v1(73.75,122.125) 73.9,122.125 74.876,123.101 v1(74.876,124.368)
  other v1: 71.689,124.431
NetC36_2: C36.2 R299.1 T2.3 T3.2 T11.1 U19.14 U21.3 U21.7 U21.12 U23.3 U23.7 U46.7 U46.12 U47.7 U47.12 U48.7 U48.12 U49.7 U49.12 U50.7 U50.12 U51.7 U51.12 | length 459
  Top Layer w0.3: U46.7@32.242,108.574 32.242,107.308 32.625,106.925 v1(39.1,106.925) 43.55,106.925 44.945,108.32 U47.7@61.706,108.32 v1@67.695,108.32 ; v1@39.001,113.524 v1(39.25,113.524) U46.12@42.917,113.524 ; v1@67.805,113.27 U47.12@72.381,113.27 ; T11.1@69.834,124.256 69.834,123.566 70.325,123.075 77.425,123.075 77.611,123.261 T2.3@81.498,123.261 85.5,123.261 87.035,124.796 T3.2@88.79,124.796 ; U49.7@89.9,108.701 91.624,108.701 v1(92.3,108.025) ; v1@92.3,113.675 v1(92.324,113.651) U49.12@100.575,113.651 ; v1(93.675,84.725) 93.7,84.7 v1(123.6,84.7) ; U48.7@118.625,108.701 v1(122.499,108.701) ; v1@122.571,119.013 122.577,119.024 v1(142.499,119.024) ; v1(122.575,113.651) U48.12@129.3,113.651 ; v1(142.349,108.207) 142.843,108.701 U50.7@147.177,108.701 153.201,108.701 v1@153.225,108.725 ; v1(153.3,108.75) 154.375,107.675 174.789,107.675 U51.7@175.816,108.701 v1(184.401,108.701) ; v1(153.325,113.675) 153.349,113.651 U50.12@157.852,113.651 ; v1(176.025,94.475) 176.099,94.475 U21.3@176.1,94.476 184.426,94.476 v1(184.432,94.47) U21.12@186.744,94.47 ; U21.3@176.07,94.27 U21.3@176.188,94.389 ; U21.3@176.249,94.45 177.77,94.45 ; v1(184.425,113.651) U51.12@186.49,113.651 ; v1@184.45,108.75 v1(184.401,108.701) ; v1(200.8,113.75) 200.849,113.701 U23.3@204.454,113.701 ; U23.7@204.454,108.701 v1(200.876,108.701) 199.7,107.525 185.125,107.525 184.401,108.249 v1(184.401,108.701)
  Top Layer w0.5: v1(175.95,89.475) 175.974,89.475 U21.7@176.124,89.325
  Bottom Layer w0.3: v1(39.1,106.925) 39.25,107.075 v1(39.25,113.524) ; v1(41.825,106.825) 41.825,103.867 42.067,103.625 42.067,57.143 41.7,56.776 41.7,34.275 v1(42.85,33.125) ; v1(55.4,123.45) 56.425,122.425 67.8,122.425 ; v1@67.9,108.325 v1(67.8,108.425) v1(67.8,113.275) 67.8,122.425 ; v1(69.809,124.431) 68.981,124.431 67.8,123.25 67.8,122.425 ; T3.2@88.79,124.796 88.79,122.81 92.3,119.3 92.3,108.25 92.075,108.025 v1(92.3,108.025) 93.675,106.65 v1(93.675,84.725) ; v1(122.55,119.025) 122.55,113.676 v1(122.575,113.651) 122.575,108.778 v1(122.499,108.701) 122.499,96.851 123.6,95.75 v1(123.6,84.7) ; v1(142.349,108.207) 142.499,108.357 v1(142.499,119.024) ; v1(153.3,108.75) 153.325,108.775 v1(153.325,113.675) ; v1(175.95,89.475) 176.025,89.55 v1(176.025,94.475) ; v1(184.425,113.651) 184.425,109 v1(184.401,108.701) 184.401,94.497 184.428,94.47 v1(184.432,94.47) ; v1(200.8,113.75) 200.8,108.778 v1(200.876,108.701)
NetD1_2: D1.2 R12.1 R13.2 | length 46.6
  Top Layer w0.3: D1.2@16.105,105.943 16.105,101.799 17.469,100.435 25.774,100.435 25.79,100.42 v1(52.555,100.42) ; R13.2@54.301,95.73 v1(54.301,97.993)
  Bottom Layer w0.3: v1(52.555,100.42) 54.301,98.674 v1(54.301,97.993)
  other v1: 54.349,95.682
NetD2_1: D2.1 D3.2 R25.2 U17.9 U17.10 U17.11 U17.12 U144.9 | length 79.1
  Top Layer w0.3: v1(95.991,144.28) 97.138,144.28 97.772,144.914 U17.12@99.992,144.914 108.011,144.914 109.733,143.192 109.733,142.4 119.244,142.4 U144.9@120.378,141.266 ; U17.9@99.992,133.624 108.524,133.624 109.766,134.866 U17.10@109.766,136.024 ; U17.11@109.669,142.332 v1(109.669,142.336) ; v1(120.8,129.105) D2.1@134.65,129.105
  Bottom Layer w0.3: v1(109.65,136.15) 109.669,136.169 v1(109.669,142.336) ; U144.9@120.378,141.266 118.841,141.266 117.725,140.15 117.725,134.85 120.8,131.775 v1(120.8,129.105) 120.8,125.6 D3.2@122.225,124.175
NetD2_2: D2.2 D4.1 R28.2 U144.5 | length 48.8
  Top Layer w0.3: U144.5@129.674,141.037 129.805,140.907 R28.2@134.23,140.907 ; v1(132.35,130.25) 132.85,130.75 135.459,130.75 137.084,129.125 149.88,129.125 150.905,130.15 158,130.15 158.225,129.925 v1(158.172,130.116)
  Bottom Layer w0.3: v1(132.35,130.25) 132.375,130.275 v1@132.375,140.682 ; D4.1@158.051,124.225 158.051,126.324 157.575,126.8 157.575,129.5 v1@158.172,130.097
  other v1: 132.4,140.925
NetD3_1: D3.1 D4.2 | length 13.5
  Top Layer w0.3: D3.1@133.401,124.175 133.476,124.1 D4.2@146.875,124.1
NetD5_1: D5.1 D10.2 | length 30.2
  Top Layer w0.3: v1(47.575,19.425) 51.468,19.425 51.8,19.093 D10.2@55.788,19.093
  Bottom Layer w0.3: D5.1@46.647,40.17 46.647,36.622 46.025,36 46.025,32.153 46.051,32.127 46.051,31.363 46.051,30.659 46.051,28.686 45.825,28.46 45.825,24.552 45.9,24.477 45.9,23.773 45.899,23.772 45.899,21.101 v1(47.575,19.425)
NetD6_2: D6.2 D7.1 R43.1 U25.7 U25.8 | length 60.8
  Top Layer w0.3: v1(32.225,49.978) U25.7@32.242,49.996 32.247,50 42.862,50 U25.8@42.917,49.945 v1@50.724,49.945
  Bottom Layer w0.3: v1@29.875,19.975 v1(29.875,19.994) 29.875,20.875 32.45,23.45 32.45,42.983 D7.1@30.878,44.555 ; D7.1@30.625,44.808 30.625,48.378 v1(32.225,49.978) ; v1@50.725,49.925 50.725,45.675 52.563,43.837 D6.2@52.563,40.595
  other v1: 50.725,49.944
NetD7_2: D7.2 D10.1 | length 18.6
  Top Layer w0.3: D7.2@46.344,44.5 47.469,45.625 v1(49.475,45.625) ; v1(52.55,36.025) 53.988,34.587 D10.1@55.788,34.587
  Bottom Layer w0.3: v1(49.475,45.625) 49.5,45.6 49.951,45.6 51.03,44.522 51.03,37.545 v1(52.55,36.025)
NetD8_1: D8.1 R44.2 U13.14 | length 144
  Top Layer w0.3: v1(150.25,54.875) 150.25,54.9 150.591,55.241 U13.14@157.85,55.241 157.893,55.2 v1(166.35,55.2) ; v1(166.25,126.225) 169.025,126.225 169.15,126.35 192.725,126.35 195.973,123.102 D8.1@213.1,123.102
  Bottom Layer w0.3: v1(143.4,50.7) 146.05,50.7 150.225,54.875 v1(150.25,54.875) ; v1@166.15,126 166.25,125.9 166.25,57.875 166.35,57.775 v1(166.35,55.2)
NetD9_1: D9.1 R45.1 U13.7 | length 44.4
  Top Layer w0.3: D9.1@111.9,41.75 D9.1@111.975,41.825 ; D9.1@112.025,41.775 113.625,41.775 114.4,42.55 120.113,42.55 120.413,42.25 141.462,42.25 141.662,42.05 v1(145.375,42.05) ; v1(143.374,48.132) 144.684,48.132 145.075,47.741 v1(147.177,47.741)
  Bottom Layer w0.3: v1(145.375,42.05) 145.375,45.939 v1(147.177,47.741)
NetR13_1: R13.1 R16.2 U14.5 | length 7.6
  Top Layer w0.3: v1(56.24,93.099) 58.305,93.099 58.5,93.294 U14.5@60.944,93.294 ; v1(56.249,95.682) 56.249,93.108 R16.2@56.435,93.294
NetR17_1: R17.1 U26.3 | length 2.8
  Top Layer w0.3: v1(58.421,55.123) U26.3@61.262,55.123
NetR17_2: R17.2 T10.1 U24.8 | length 210.2
  Top Layer w0.3: v1@55.256,55.194 R17.2@56.45,55.194 ; v1(56.781,64.641) 57.616,64.641 57.875,64.9 84.575,64.9 85.885,63.59 97.265,63.59 v1(97.275,63.6) ; v1(97.225,59.575) 97.275,59.625 97.425,59.625 97.7,59.35 147.675,59.35 148.975,60.65 174.277,60.65 174.502,60.425 181.65,60.425 182.7,61.475 193.525,61.475 193.95,61.05 v1(218.15,61.05) ; U24.8@215.383,89.22 v1(218.17,89.22)
  Bottom Layer w0.3: v1(55.125,55.325) 55.125,63.875 55.891,64.641 v1(56.781,64.641) ; v1(97.225,59.575) 97.275,59.625 v1(97.275,63.6) ; v1(218.15,61.05) 218.15,89.2 v1(218.17,89.22)
NetR18_1: R18.1 U14.12 | length 180.9
  Top Layer w0.3: v1@73.3,39.256 v1@172.734,39.256 ; R18.1@163.926,27.418 163.926,26.199 164.475,25.65 172.475,25.65 v1(172.925,26.1)
  Bottom Layer w0.3: v1(71.619,95.744) 72.531,95.744 73.3,94.975 v1(73.3,39.275) ; v1@172.915,26.1 v1(172.915,39.225)
NetR18_2: R18.2 T6.1 U15.3 U15.7 | length 29.4
  Top Layer w0.3: T6.1@166.25,30.295 165.826,29.871 R18.2@165.826,27.418 165.826,26.824 166.375,26.275 171.344,26.275 172.7,27.631 172.7,29.925 173.418,30.643 U15.3@176.07,30.643 v1(179.543,30.643) ; U15.7@176.07,25.643 v1(179.682,25.643)
  Bottom Layer w0.3: v1(179.543,30.643) 179.543,28.525 179.682,28.387 v1(179.682,25.643)